# Allegro board DRV8313_V10_220621.brd
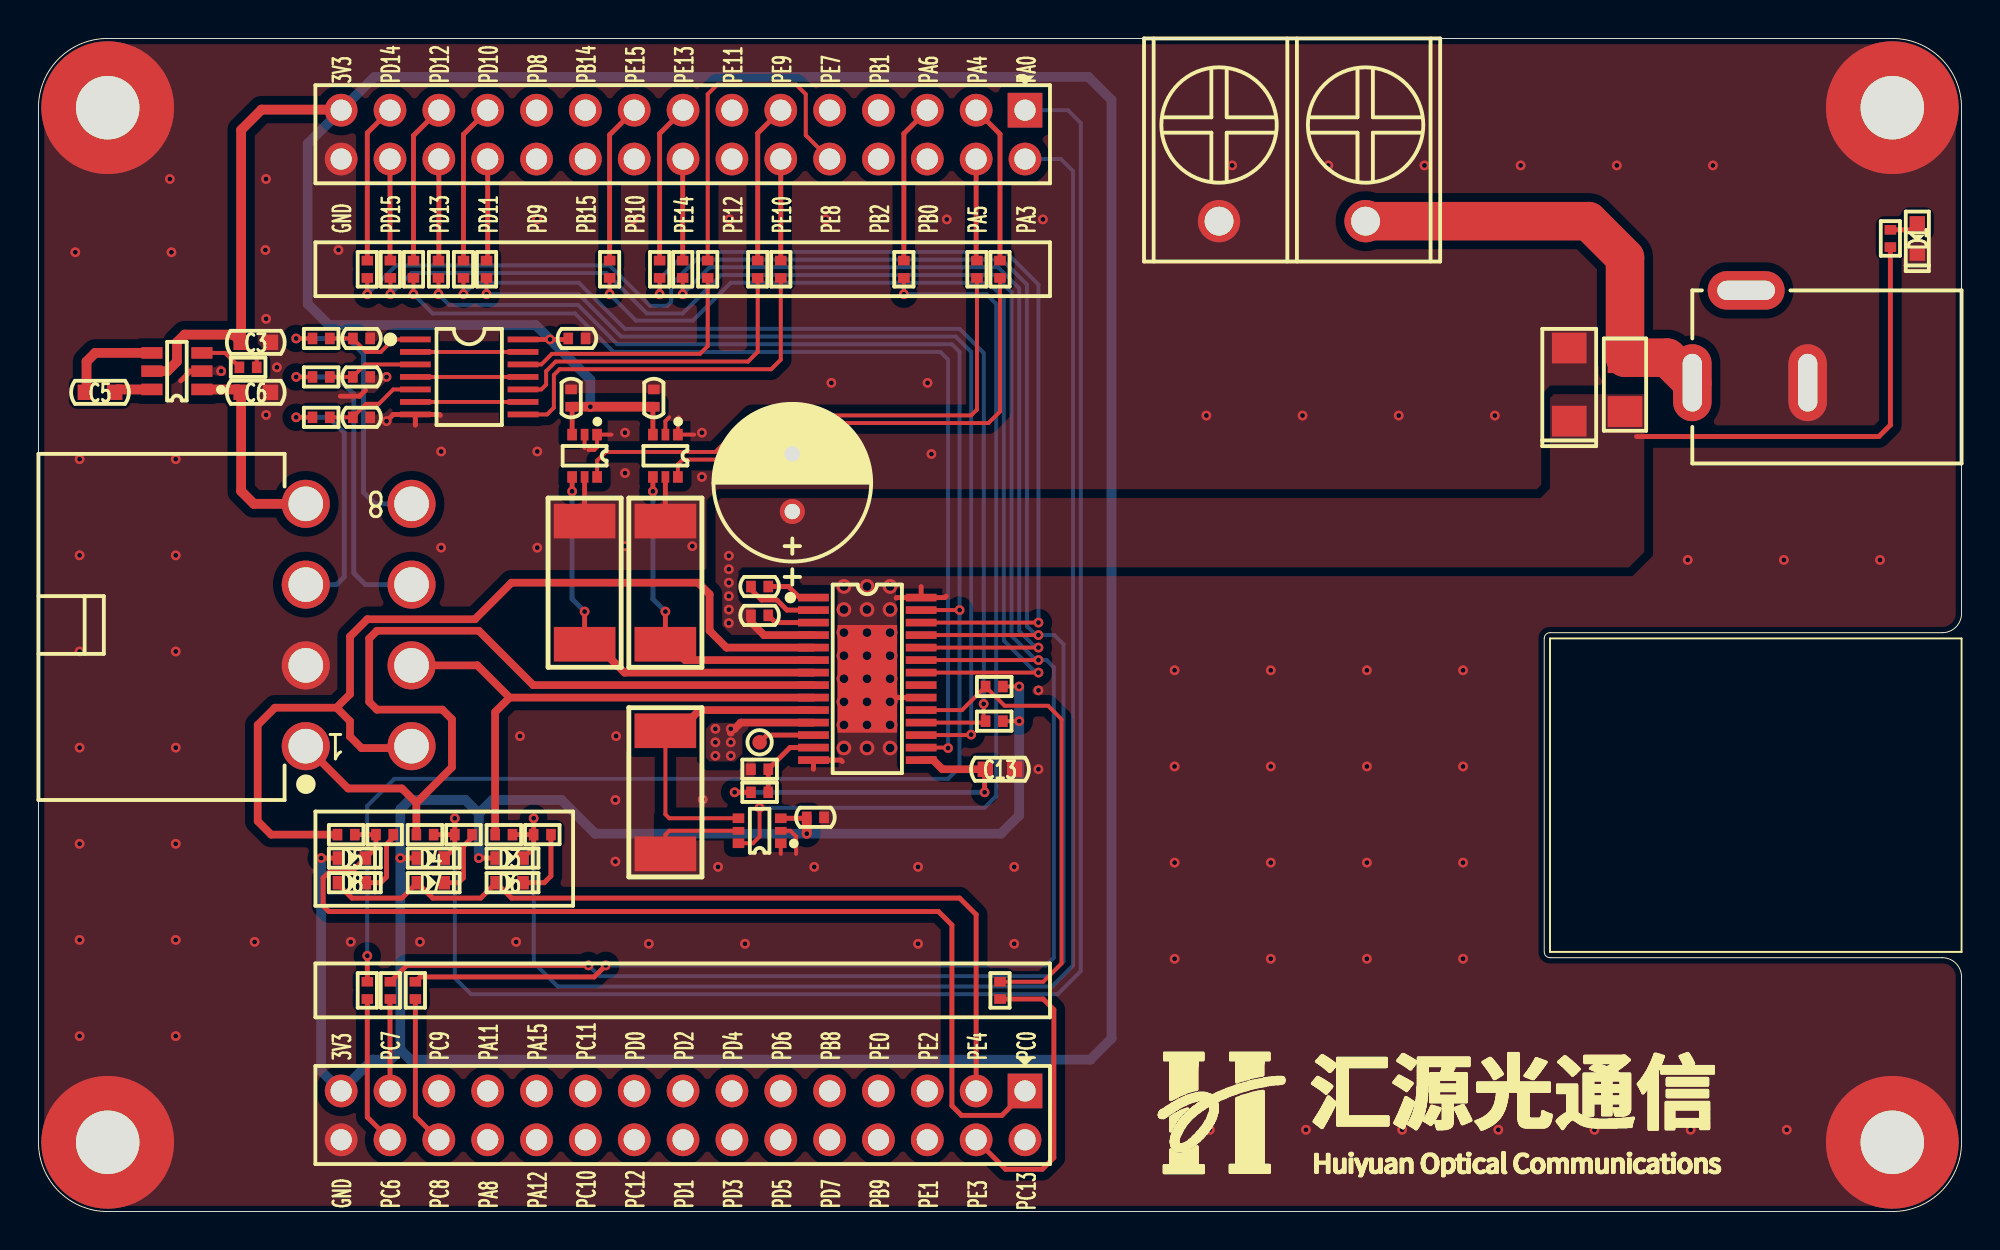
[diagram p0: board, top side]
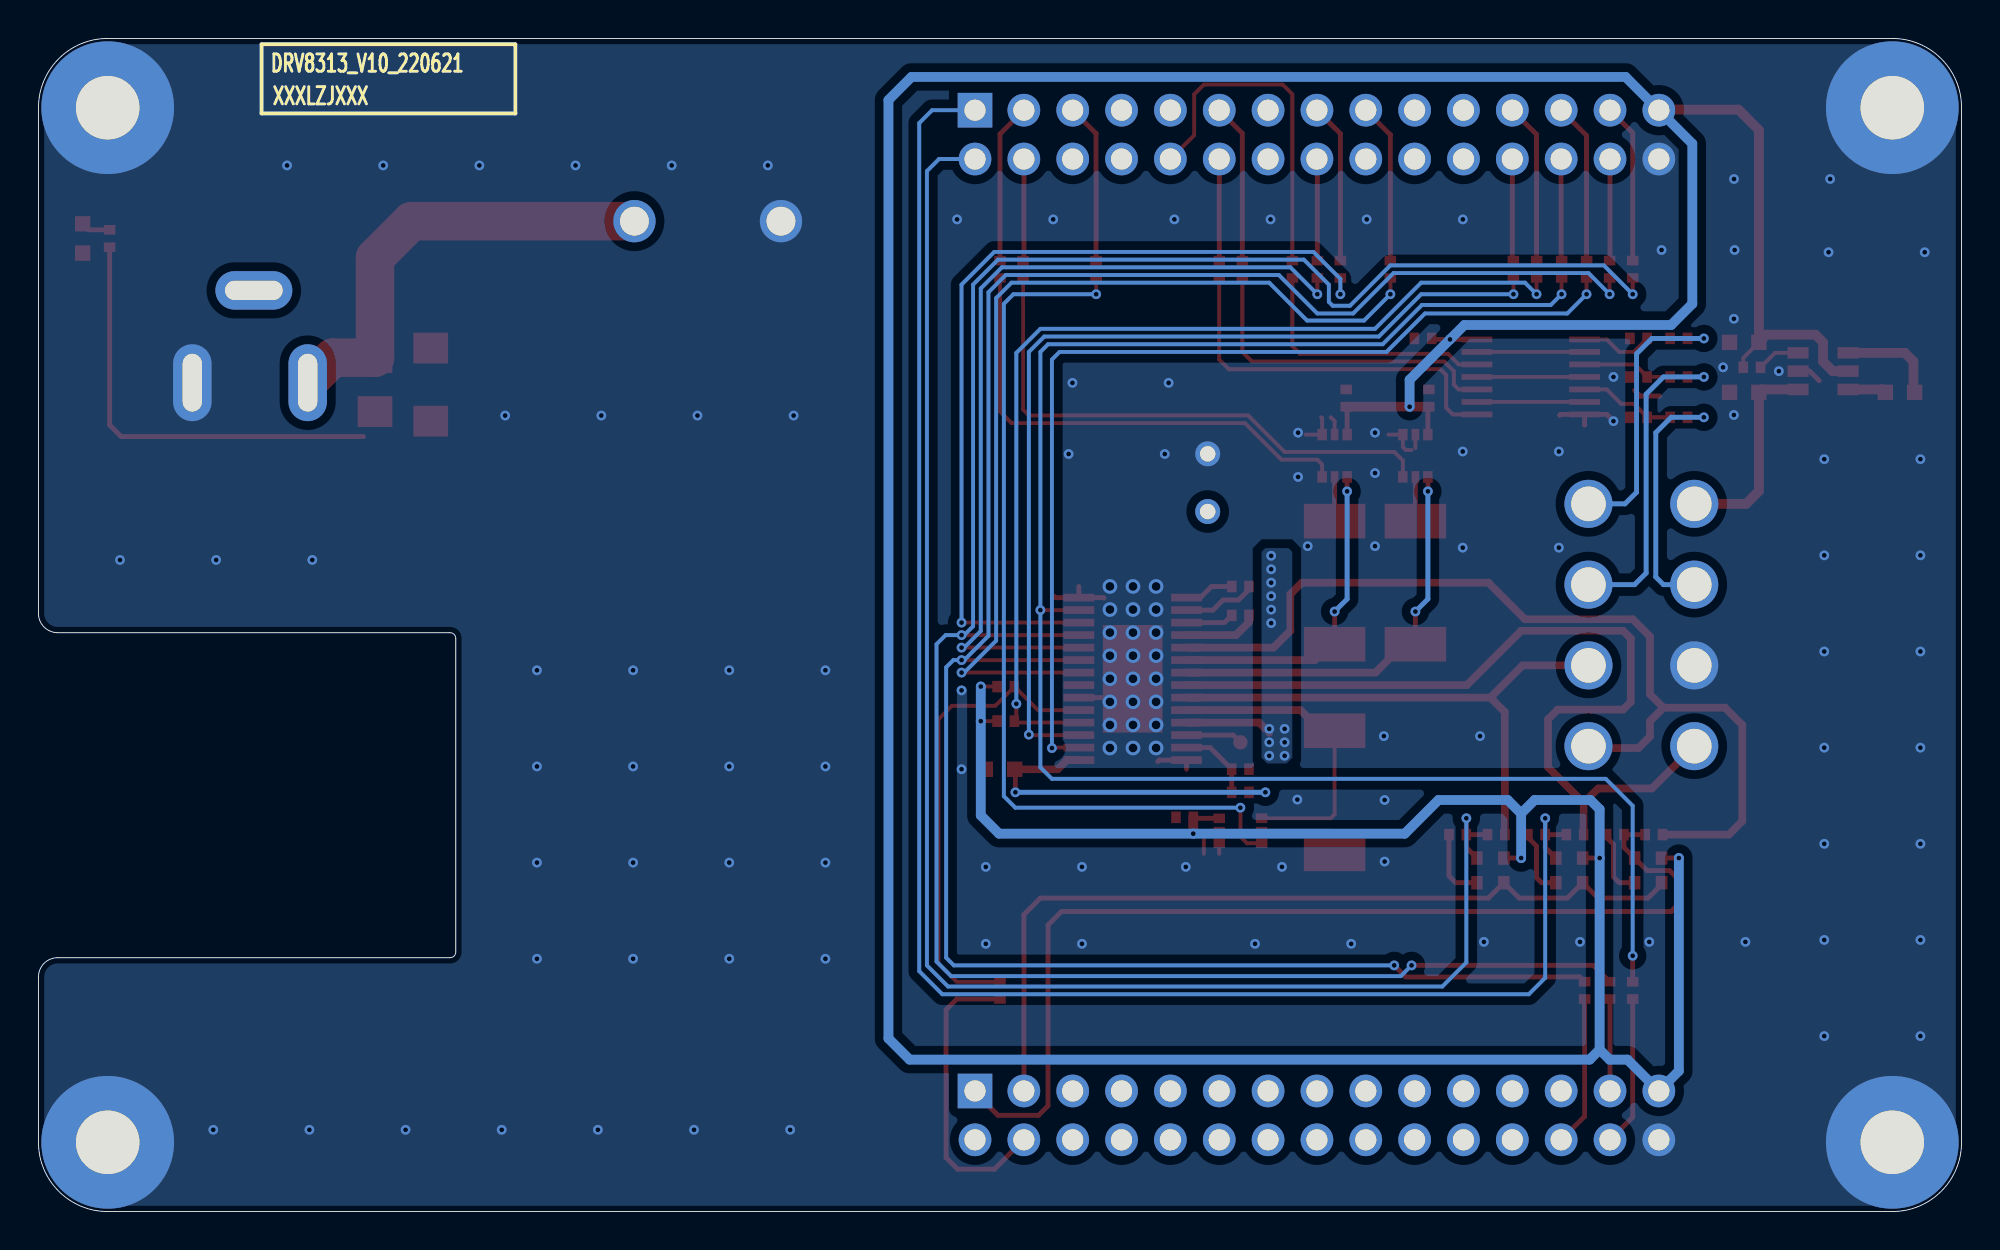
[diagram p1: board, bottom side, seen from below]

Outline 100 x 61 mm; copper layers: TOP, BOTTOM. Coordinates in mm from the lower left corner of the outline.
Outline path: 0,57.4 arc(1.05,59.95) 3.6,61 96.4,61 arc(98.95,59.95) 100,57.4 100,31.1 arc(99.71,30.39) 99,30.1 78.6,30.1 arc(78.39,30.01) 78.3,29.8 78.3,13.5 arc(78.39,13.29) 78.6,13.2 99,13.2 arc(99.71,12.91) 100,12.2 100,3.6 arc(98.95,1.05) 96.4,0 3.6,0 arc(1.05,1.05) 0,3.6 0,57.4

## Design rules (mm)
constraint set DEFAULT: min track width 0.203, pair gap 0.203

## Placement (name value [footprint] x y rotation side)
C1  100nF_50V  [C0402]  16.8 45.4 0 top
C2  100nF_50V  [C0402]  28 45.4 0 top
C3  10uF_10V  [C0603]  11.3 45.2 0 top
C4  100nF_50V  [C0402]  16.8 43.4 0 top
C5  10uF_10V  [C0603]  3.2 42.6 180 top
C6  10uF_10V  [C0603]  11.3 42.6 0 top
C7  100nF_50V  [C0402]  27.7 42.3 90 top
C8  100nF_50V  [C0402]  32 42.3 90 top
C9  100nF_50V  [C0402]  16.8 41.3 0 top
C10  100uF_50V  [CAP-3R0-8X12]  39.2 37.9 90 top
C11  10nF_50V  [C0402]  37.5 32.5 0 top
C12  100nF_50V  [C0402]  37.5 31 0 top
C13  10uF_10V  [C0603]  50 23 0 top
C14  100nF_50V  [C0402]  40.4 20.5 0 top
D1  GREEN-0603  [LED0603]  97.7 50.6 270 top
D2  SS56F  [SMAF]  79.6 43 270 top
D3  LRB521S-40T1G/NI  [SOD523]  24.5 18.38 180 top
D4  LRB521S-40T1G/NI  [SOD523]  20.4 18.38 180 top
D5  LRB521S-40T1G/NI  [SOD523]  16.3 18.38 180 top
D6  LRB521S-40T1G/NI  [SOD523]  24.5 17.1 180 top
D7  LRB521S-40T1G/NI  [SOD523]  20.4 17.1 180 top
D8  LRB521S-40T1G/NI  [SOD523]  16.3 17.1 180 top
DC1  -  [DC005]  92 43.1 180 top
F1  0469005.WR  [FUSE1206]  82.5 43 270 top
J1  -  [CN2X15-2P54-Z]  51.3 57.27 180 top
J2  KF7.62-2P  [KF7R62-2P]  65.2 51.5 0 top
J3  -  [HX42003-8WAF]  13.9 30.5 180 top
J4  -  [CN2X15-2P54-Z]  51.3 6.27 180 top
MH1  HOLE_M3/NI  [HOLE6R90X3R40]  3.6 57.4 0 top
MH2  HOLE_M3/NI  [HOLE6R90X3R40]  96.4 57.4 0 top
MH3  HOLE_M3/NI  [HOLE6R90X3R40]  3.6 3.6 0 top
MH4  HOLE_M3/NI  [HOLE6R90X3R40]  96.4 3.6 0 top
NOREF  -  []  0 0 90 top
NOREF#2  -  []  0 0 0 top
NOREF#3  -  []  0 0 0 top
NOREF#4  -  []  0 0 0 top
NOREF#5  -  []  0 0 90 top
NOREF#6  -  []  0 0 90 top
R1  47K  [R0402]  96.3 50.6 90 top
R2  0R  [R0402]  17.1 49 90 top
R3  0R  [R0402]  18.3 49 90 top
R4  0R  [R0402]  19.5 49 90 top
R5  0R  [R0402]  20.8 49 90 top
R6  0R  [R0402]  22.1 49 90 top
R7  0R  [R0402]  23.3 49 90 top
R8  0R  [R0402]  29.7 49 90 top
R9  0R  [R0402]  32.3 49 90 top
R10  0R  [R0402]  33.5 49 90 top
R11  0R  [R0402]  37.4 49 90 top
R12  0R  [R0402]  38.6 49 90 top
R13  0R  [R0402]  34.8 49 90 top
R14  0R  [R0402]  45 49 90 top
R15  0R  [R0402]  50 49 90 top
R16  0R  [R0402]  48.8 49 90 top
R17  1K  [R0402]  14.7 45.4 0 top
R18  10K  [R0402]  10.9 43.9 0 top
R19  1K  [R0402]  14.7 43.4 0 top
R20  1K  [R0402]  14.7 41.3 0 top
R21  5mR  [R2512]  28.4 32.7 270 top
R22  5mR  [R2512]  32.6 32.7 270 top
R23  10K  [R0402]  49.7 27.3 0 top
R24  10K  [R0402]  49.7 25.5 0 top
R25  10K/NI  [R0402]  37.5 23 0 top
R26  10K/NI  [R0402]  37.5 21.8 180 top
R27  5mR  [R2512]  32.6 21.8 90 top
R28  10K/NI  [R0402]  24.2 19.6 0 top
R29  2.2K/NI  [R0402]  26.2 19.6 0 top
R30  10K/NI  [R0402]  20.1 19.6 0 top
R31  2.2K/NI  [R0402]  22.1 19.6 0 top
R32  10K/NI  [R0402]  16 19.6 0 top
R33  2.2K/NI  [R0402]  18 19.6 0 top
R34  0R/NI  [R0402]  17.1 11.5 270 top
R35  0R/NI  [R0402]  18.3 11.5 270 top
R36  0R/NI  [R0402]  19.6 11.5 270 top
R37  0R  [R0402]  50 11.5 270 top
TP1  TP/NI  [TP-0R75]  37.5 24.4 90 top
U1  ME2135A50M6G  [SOT23-6]  7.2 43.7 90 top
U2  SN74LVC14APW  [TSSOP14]  22.4 43.4 270 top
U3  INA199A2DCKR  [SOT363]  28.4 39.3 180 top
U4  INA199A2DCKR  [SOT363]  32.6 39.3 180 top
U5  DRV8313PWP  [HTSSOP28-9R8X4R5X0R65-5R6X3R1]  43.1 27.7 270 top
U6  INA199A2DCKR  [SOT363]  37.5 19.8 90 top

## Library data of the parts
C1 C2 C4 C9 = CAP NP_2
C3 C5-C8 C11-C14 = CAP NP
C10 = CAPT_100UF_3528_6r3V_10%_LXXXX
D1 = LED_4
D2-D8 = DIODE13_9
DC1 = DC005
F1 = FUSE
J1 J4 = CONN RCPT 15x2
J2 = CONN RCPT 2
J3 = HX30002-10A_1
MH1-MH4 = Hold_1
R1-R37 = R_Generic
TP1 = TP
U1 = ME2135A50M6G
U2 = SN74LVC14APW
U3 U4 U6 = INA199A2DCKR
U5 = DRV8313PWP

## Footprints (pads in the part's own frame, mm; a bottom-side part is the same pattern mirrored in y, then rotated)
C0402
  rect 0.5x0.6 smd: 1(-0.45,0) 2(0.45,0)
C0603
  rect 0.8x0.8 smd: 1(-0.762,0) 2(0.762,0)
CAP-3R0-8X12
  round 1.3 hole 0.8: 1(-1.5,0) 2(1.5,0)
CN2X15-2P54-Z
  rect 1.8x1.8 hole 1.1: 1(0,0)
  round 1.7 hole 1.1: 2(0,2.54) 3(2.54,0) 4(2.54,2.54) 5(5.08,0) 6(5.08,2.54) 7(7.62,0) 8(7.62,2.54) 9(10.16,0) 10(10.16,2.54) 11(12.7,0) 12(12.7,2.54) 13(15.24,0) 14(15.24,2.54) 15(17.78,0) 16(17.78,2.54) 17(20.32,0) 18(20.32,2.54) 19(22.86,0) 20(22.86,2.54) 21(25.4,0) 22(25.4,2.54) 23(27.94,0) 24(27.94,2.54) 25(30.48,0) 26(30.48,2.54) 27(33.02,0) 28(33.02,2.54) 29(35.56,0) 30(35.56,2.54)
DC005
  oval 2x4 hole 1x3: 1(6,0) 2(0,0)
  oval 4x2 hole 3x1: 3(3.2,-4.8)
FUSE1206
  rect 1.6x1.8 smd: 1(-1.4,0) 2(1.4,0)
HOLE6R90X3R40
  round 6.9 hole 3.3: 1(0,0)
HTSSOP28-9R8X4R5X0R65-5R6X3R1
  rect 0.4x1.6 smd: 1(-4.225,-2.8) 2(-3.575,-2.8) 3(-2.925,-2.8) 4(-2.275,-2.8) 5(-1.625,-2.8) 6(-0.975,-2.8) 7(-0.325,-2.8) 8(0.325,-2.8) 9(0.975,-2.8) 10(1.625,-2.8) 11(2.275,-2.8) 12(2.925,-2.8) 13(3.575,-2.8) 14(4.225,-2.8) 15(4.225,2.8) 16(3.575,2.8) 17(2.925,2.8) 18(2.275,2.8) 19(1.625,2.8) 20(0.975,2.8) 21(0.325,2.8) 22(-0.325,2.8) 23(-0.975,2.8) 24(-1.625,2.8) 25(-2.275,2.8) 26(-2.925,2.8) 27(-3.575,2.8) 28(-4.225,2.8)
  rect 5.6x3.1 smd: 29(0,0)
HX42003-8WAF
  round 2.5 hole 1.8: 1(0,6.3) 2(0,2.1) 3(0,-2.1) 4(0,-6.3) 5(-5.5,6.3) 6(-5.5,2.1) 7(-5.5,-2.1) 8(-5.5,-6.3)
KF7R62-2P
  round 2.2 hole 1.5: 1(-3.81,0) 2(3.81,0)
LED0603
  rect 0.8x0.8 smd: 1(-0.762,0) 2(0.762,0)
R0402
  rect 0.5x0.6 smd: 1(-0.45,0) 2(0.45,0)
R2512
  rect 1.8x3.2 smd: 1(-3.2,0) 2(3.2,0)
SMAF
  rect 1.6x1.8 smd: 1(-1.9,0) 2(1.9,0)
SOD523
  rect 0.6x0.7 smd: 1(-0.7,0) 2(0.7,0)
SOT23-6
  rect 0.6x1.1 smd: 1(-0.95,-1.3) 2(0,-1.3) 3(0.95,-1.3) 4(0.95,1.3) 5(0,1.3) 6(-0.95,1.3)
SOT363
  rect 0.5x0.6 smd: 1(-0.65,-1.1) 3(0.65,-1.1) 4(0.65,1.1) 6(-0.65,1.1)
  rect 0.4x0.6 smd: 2(0,-1.1) 5(0,1.1)
TP-0R75
  round 0.75 smd: 1(0,0)
TSSOP14
  rect 0.3x1.6 smd: 1(-1.95,-2.8) 2(-1.3,-2.8) 3(-0.65,-2.8) 4(0,-2.8) 5(0.65,-2.8) 6(1.3,-2.8) 7(1.95,-2.8) 8(1.95,2.8) 9(1.3,2.8) 10(0.65,2.8) 11(0,2.8) 12(-0.65,2.8) 13(-1.3,2.8) 14(-1.95,2.8)

## Nets
GND: C1.2 C2.2 C3.2 C4.2 C6.2 C7.2 C8.2 C9.2 C10.2 C13.2 C14.2 D1.2(CATHODE) D2.1 DC1.2 J1.30 J2.1 J3.2 J4.30 MH1.1 MH2.1 MH3.1 MH4.1 R21.1 R22.1 R25.1 R27.1 U1.2 U2.7 U3.1 U3.2 U3.5 U4.1 U4.2 U4.5 U5.14 U5.20 U5.28 U5.29 U6.1 U6.2 U6.5
PGND1: R22.2 U4.4 U5.6
PGND2: R21.2 U3.4 U5.7
PGND3: R27.2 U5.10 U6.4
VCC_3.3V: C2.1 C3.1 C7.1 C8.1 C14.1 D3.2(ANODE_2) D4.2(ANODE_2) D5.2(ANODE_2) J1.29 J4.29 R18.2 R23.2 R24.2 U1.5 U2.14(VCC) U3.3(V+) U4.3(V+) U6.3(V+)
VCC_3.3V_MOTOR: C13.1 R26.2 U5.15
VCC_5V: C6.1 J3.4 U1.1(VO)
VCC_24V: C10.1 C12.1 D2.2(ANODE_2) F1.2 R1.1 U5.4 U5.11(VM_2)
VCC_24V_IN: DC1.1 F1.1 J2.2
COMPN: R25.2 R26.1 U5.13
COMPP: TP1.1 U5.12
CURR_U: R15.1 U4.6
CURR_V: R16.1 U3.6
CURR_W: R14.1 U6.6
EN1: R9.1 U5.26
EN2: R10.1 U5.24
EN3: R8.1 U5.22
H1: J3.8 R17.1
H2: J3.7 R19.1
H3: J3.3 R20.1
HALL_H1: R13.1 U2.12
HALL_H2: R11.1 U2.10
HALL_H3: R12.1 U2.8
IN1: R5.1 R34.1 U5.27
IN2: R2.1 R35.1 U5.25
IN3: R3.1 R36.1 U5.23
MOTOR_U: J3.5 R32.1 U5.5
MOTOR_V: J3.1 R30.1 U5.8
MOTOR_W: J3.6 R28.1 U5.9
NCOMPO: R23.1 R37.1 U5.19
NFAULT: R6.1 R24.1 U5.18
NRESET: R4.1 U5.16
NSLEEP: R7.1 U5.17
PA0: D4.1 J1.1 R30.2 R31.1
PA3: D3.1 J1.2 R28.2 R29.1
PA4: J1.3 R15.2
PA5: J1.4 R16.2
PA6: J1.5 R14.2
PA8: J4.24
PA11: J4.23
PA12: J4.22
PA15: J4.21
PB0: J1.6
PB1: J1.7
PB2: J1.8
PB8: J4.9
PB9: J4.8
PB10: J1.18
PB14: J1.19
PB15: J1.20
PC0: D5.1 J4.1 R32.2 R33.1
PC6: J4.28 R34.2
PC7: J4.27 R35.2
PC8: J4.26 R36.2
PC9: J4.25
PC10: J4.20
PC11: J4.19
PC12: J4.18
PC13: J4.2
PD0: J4.17(9)
PD1: J4.16
PD2: J4.15
PD3: J4.14
PD4: J4.13
PD5: J4.12
PD6: J4.11
PD7: J4.10
PD8: J1.21
PD9: J1.22
PD10: J1.23 R6.2
PD11: J1.24 R7.2
PD12: J1.25 R4.2
PD13: J1.26 R5.2
PD14: J1.27 R2.2
PD15: J1.28 R3.2
PE0: J4.7
PE1: J4.6
PE2/SPI0_CS: J4.5
PE3: J4.4 R37.2
PE4: D6.2(ANODE_2) D7.2(ANODE_2) D8.2(ANODE_2) J4.3
PE7: J1.9
PE8: J1.10 R13.2
PE9: J1.11 R11.2
PE10: J1.12 R12.2
PE11: J1.13
PE12: J1.14
PE13: J1.15 R9.2
PE14: J1.16 R10.2
PE15: J1.17(9) R8.2
N17281076: D8.1 R33.2
N17281273: D7.1 R31.2
N17281452: D6.1 R29.2
N17289816: C11.2 U5.1
N17289823: C11.1 U5.2
N17289896: C12.2 U5.3
N17294145: U2.6 U2.9
N17294151: U2.4 U2.11
N17294165: U2.2 U2.13
N17294205: C1.1 R17.2 U2.1
N17294227: C4.1 R19.2 U2.3
N17294251: C9.1 R20.2 U2.5
N17299802: C5.1 U1.6
N17299805: C5.2 U1.4
N17300514: R18.1 U1.3
N17303878: D1.1 R1.2

Pads without a net: DC1 3; U5 21

## Via types
v1: diameter 0.508, hole 0.254, TOP to BOTTOM, 155 vias
v2: diameter 0.762, hole 0.457, TOP to BOTTOM, 24 vias

## Routing (per net, layer and track width the routed paths; a pad name or vN(x,y) marks a point on that pad's centre or on a via; arc(x,y) is an arc through that point)
GND: length 31.9
  TOP w0.203: U3.2 28.4,39.7 ; 33.3,41.3 33.25,41.25 U4.1 34.1,40.4 ; 39.4,18.6 39.4,19.5 39.1,19.8 U6.2 ; 29.8,40.4 U3.1 29.05,39.75 28.9,39.6 28.6,39.6 ; R27.1 32.6,19.6 32.8,19.8 U6.5 ; U4.2 32.6,41.1 32.8,41.3 ; U6.1 38.6,18.6
  TOP w0.254: 19.6,40.9 19.6,40.9 U2.7 ; U4.5 R22.1 ; U5.28 44.62,31.93 44.6,31.9 ; U5.28 47.12,31.93 47.2,32 ; U5.28 45.9,32.5 ; U2.7 20.85,41.45 20.9,41.4 ; U2.7 18.45,41.45 v1(18.1,41.1) ; 41.8,23.4 41.73,23.48 U5.14 40.3,23 ; 17,42.7 16.7,42.4 15.7,42.4 ; 7.4,43.2 7.9,43.7 U1.2 ; U5.20 44.08,26.73 U5.29 ; U3.5 R21.1
  vias: v1(1.92,49.88) v1(2.14,39.12) v1(2.14,34.12) v1(2.14,29.12) v1(2.14,24.12) v1(2.14,19.12) v1(2.14,14.12) v1(2.14,9.12) v1(6.83,53.69) v1(6.92,49.88) v1(7.14,39.12) v1(7.14,34.12) v1(7.14,29.12) v1(7.14,24.12) v1(7.14,19.12) v1(7.14,14.12) v1(7.14,9.12) v1(9.5,43.7) v1(11.24,14.02) v1(11.83,53.69) v1(11.8,50) v1(11.84,46.42) v1(11.84,41.42) v1(12.4,43.9) v1(15.6,50) v1(16.24,14.02) v1(18.1,43.4) v1(19.84,14.02) v1(20.94,39.52) v1(20.94,34.52) v1(24.84,14.02) v1(25.04,24.72) v1(25.93,51.59) v1(25.94,39.52) v1(25.94,34.52) v1(30.04,24.72) v1(30,21.4) v1(30,18.2) v1(30.5,40.5) v1(30.5,38.4) v1(30.5,34.6) v1(30.93,51.59) v1(31.74,13.92) v1(34,34.6) v1(34.5,40.5) v1(34.5,38.2) v1(34.54,21.42) v1(35.34,17.92) v1(35.93,51.59) v1(36.74,13.92) v1(40.34,17.92) v1(40.93,51.59) v1(41.23,43.09) v1(41.43,39.39) v1(45.74,17.92) v1(45.74,13.92) v1(46.23,43.09) v1(46.43,39.39) v1(47.23,51.59) v1(50.74,17.92) v1(50.74,13.92) v1(52,27.1) v1(52,23) v1(52.23,51.59) v1(59.08,28.14) v1(59.08,23.14) v1(59.08,18.14) v1(59.08,13.14) v1(60.73,41.39) v1(60.91,4.25) v1(62.07,54.4) v1(64.08,28.14) v1(64.08,23.14) v1(64.08,18.14) v1(64.08,13.14) v1(65.73,41.39) v1(65.91,4.25) v1(67.07,54.4) v1(69.08,28.14) v1(69.08,23.14) v1(69.08,18.14) v1(69.08,13.14) v1(70.73,41.39) v1(70.91,4.25) v1(72.07,54.4) v1(74.08,28.14) v1(74.08,23.14) v1(74.08,18.14) v1(74.08,13.14) v1(75.73,41.39) v1(75.91,4.25) v1(77.07,54.4) v1(80.91,4.25) v1(82.07,54.4) v1(85.76,33.88) v1(85.91,4.25) v1(87.07,54.4) v1(90.76,33.88) v1(90.91,4.25) v1(95.76,33.88) v2(41.88,32.5) v2(41.88,31.3) v2(41.88,30.1) v2(41.88,28.9) v2(41.88,27.7) v2(41.88,26.5) v2(41.88,25.3) v2(41.88,24.1) v2(43.08,32.5) v2(43.08,31.3) v2(43.08,30.1) v2(43.08,28.9) v2(43.08,27.7) v2(43.08,26.5) v2(43.08,25.3) v2(43.08,24.1) v2(44.28,32.5) v2(44.28,31.3) v2(44.28,30.1) v2(44.28,28.9) v2(44.28,27.7) v2(44.28,26.5) v2(44.28,25.3) v2(44.28,24.1)
PGND1: length 17
  TOP w0.254: R22.2 v1(32.6,31.2) ; U4.4 v1(31.95,37.45)
  TOP w0.4: U5.6 33.62,28.68 32.8,29.5 R22.2
  BOTTOM w0.254: v1(31.95,37.45) 31.95,31.85 v1(32.6,31.2)
PGND2: length 21.5
  TOP w0.254: U3.4 v1(27.75,37.45) ; R21.2 v1(28.4,31.2)
  TOP w0.4: R21.2 28.45,29.55 28.95,29.55 30.48,28.02 U5.7
  BOTTOM w0.254: v1(28.4,31.2) 27.75,31.85 v1(27.75,37.45)
PGND3: length 16.4
  TOP w0.203: U6.4 32.8,20.45 32.6,20.65 R27.2
  TOP w0.4: R27.2 33.3,25 34.38,26.07 U5.10
VCC_3.3V: length 269.1
  TOP w0.203: C3.1 11.35,44.39 R18.2 ; R24.2 v1(51,25.5) ; R23.2 v1(51,27.3)
  TOP w0.254: C7.1 27.75,41.8 U3.3 ; D5.2 v1(14.7,18.38) ; U6.3 39.9,20.45 C14.1 ; D3.2 v1(22.9,18.38) ; C2.1 27.5,45.35 v1(26.6,45.35) U2.14 ; D4.2 v1(18.82,18.38) ; U4.3 31.95,41.8 C8.1
  TOP w0.508: C14.1 v1(39.95,19.65) ; C7.1 v1(28.7,41.85) C8.1 ; J1.29 15.71,57.3 11.6,57.3 10.54,56.24 C3.1 10.14,45.6 7.6,45.6 7.2,45.2 7.2,44.2 6.7,43.7 U1.5
  BOTTOM w0.508: v1(14.7,18.38) 14.7,7.31 J4.29 17.37,7.9 18.3,7.9 18.82,8.42 ; v1(22.9,18.38) 22.9,20.7 ; 22.9,20.7 23.6,21.4 27.2,21.4 28.95,19.65 v1(39.95,19.65) 50.05,19.65 51,20.6 v1(51,25.5) v1(51,27.3) ; 22.9,20.7 22.2,21.4 19.3,21.4 18.82,20.92 v1(18.82,18.38) 18.82,8.42 ; 18.82,8.42 19.34,7.9 54.7,7.9 55.8,9 55.8,57.8 54.6,59 17.47,59 J1.29 14,55.53 14,47.2 15.1,46.1 25.85,46.1 v1(26.6,45.35) 28.7,43.25 v1(28.7,41.85)
VCC_3.3V_MOTOR: length 18.6
  TOP w0.254: v1(49.2,21.8) 49.2,22.96 C13.1 ; R26.2 v1(36.2,21.8)
  TOP w0.4: C13.1 47,23 46.52,23.48 U5.15
  BOTTOM w0.254: v1(36.2,21.8) v1(49.2,21.8)
VCC_5V: length 10.9
  TOP w0.508: J3.4 11.2,36.8 10.54,37.46 C6.1 10.39,42.75 U1.1
VCC_24V: length 31.2
  TOP w0.254: R1.1 96.3,40.9 95.7,40.3 83.1,40.3
  TOP w0.4: 40.3,29.98 37.73,29.98 37.05,30.65 C12.1 ; U5.11 36.52,25.43 36.2,25.1 v1(36,25.1) 36,24.9
  vias: v1(35.2,25.1) v1(35.2,24.4) v1(35.2,23.7) v1(35.9,34.1) v1(35.9,33.4) v1(35.9,32.7) v1(35.9,32) v1(35.9,31.3) v1(35.9,30.6) v1(36,24.4) v1(36,23.7)
VCC_24V_IN: length 23.5
  TOP w2: DC1.1 84.7,44.4 F1.1 82.5,49.6 80.6,51.5 J2.2
COMPN: length 4
  TOP w0.254: U5.13 39.08,24.12 R25.2 R26.1
COMPP: length 3
  TOP w0.254: TP1.1 37.88,24.77 U5.12
CURR_U: length 25.5
  TOP w0.203: R15.1 50,41.6 49.4,41 37.27,41 35.37,39.1 33.5,39.1 33.25,38.85 U4.6
CURR_V: length 28.5
  TOP w0.203: U3.6 29.05,39.05 29.5,39.5 35.2,39.5 37.1,41.4 48.5,41.4 48.8,41.7 R16.1
CURR_W: length 46.7
  TOP w0.203: R14.1 v1(45,47.7) ; v1(37.5,21) 37.5,19.5 37.15,19.15 U6.6
  BOTTOM w0.203: v1(37.5,21) 49.2,21 49.8,21.6 49.8,47.2 49.3,47.7 v1(45,47.7)
EN1: length 46.3
  TOP w0.203: R9.1 v1(32.3,47.7) ; U5.26 v1(52,30.62)
  BOTTOM w0.203: v1(52,30.62) 52,48.2 50.3,49.9 33.7,49.9 32.3,48.5 v1(32.3,47.7)
EN2: length 44.7
  TOP w0.203: U5.24 v1(52,29.32) ; R10.1 v1(33.5,47.7)
  BOTTOM w0.203: v1(33.5,47.7) 34.9,49.1 49.9,49.1 51,48 51,30.18 51.86,29.32 v1(52,29.32)
EN3: length 49.5
  TOP w0.203: U5.22 v1(52,28.02) ; R8.1 v1(29.7,47.7)
  BOTTOM w0.203: v1(29.7,47.7) 31.07,46.33 34.03,46.33 36,48.3 49.4,48.3 50.2,47.5 50.2,29.68 51.86,28.02 v1(52,28.02)
H1: length 14.6
  TOP w0.203: R17.1 v1(13.4,45.4)
  BOTTOM w0.254: v1(13.4,45.4) 16.1,45.4 16.9,44.6 16.9,37.4 17.5,36.8 J3.8
H2: length 16.8
  TOP w0.203: R19.1 v1(13.4,43.4)
  BOTTOM w0.254: v1(13.4,43.4) 15.5,43.4 16.4,42.5 16.4,33.2 17,32.6 J3.7
H3: length 13.3
  TOP w0.203: R20.1 v1(13.4,41.3)
  BOTTOM w0.254: v1(13.4,41.3) 15.1,41.3 15.9,40.5 15.9,33 15.5,32.6 J3.3
HALL_H1: length 13.5
  TOP w0.203: R13.1 34.8,45 34.4,44.6 26.7,44.6 26.15,44.05 U2.12
HALL_H2: length 17.3
  TOP w0.203: U2.10 26.15,42.75 26.4,43 26.4,43.7 26.9,44.2 36.9,44.2 37.4,44.7 R11.1
HALL_H3: length 19.8
  TOP w0.203: U2.8 26.45,41.45 26.8,41.8 26.8,43.5 27.1,43.8 38.1,43.8 38.6,44.3 R12.1
IN1: length 93.6
  TOP w0.203: R5.1 v1(20.8,47.7) ; v1(47.9,31.27) U5.27
  TOP w0.254: R34.1 v1(17.1,13.3)
  BOTTOM w0.203: v1(20.8,47.7) 21.36,47.14 28.06,47.14 30.1,45.1 47.5,45.1 47.9,44.7 v1(47.9,31.27) 47.9,23.1 47.3,22.5 18.5,22.5 17.1,21.1 v1(17.1,13.3)
IN2: length 117.2
  TOP w0.203: R2.1 v1(17.1,47.7) ; 45.9,29.98 v1(52,29.98)
  TOP w0.254: R35.1 19.15,12.8 v1(28.6,12.8)
  BOTTOM w0.203: v1(17.1,47.7) 18.6,49.2 29.7,49.2 31.8,47.1 32.7,47.1 32.9,47.3 32.9,48.2 34.2,49.5 50.1,49.5 51.4,48.2 51.4,30.43 51.86,29.98 v1(52,29.98) 52.83,29.98 53.3,29.5 53.3,13 52.54,12.24 29.16,12.24 v1(28.6,12.8)
IN3: length 111.3
  TOP w0.203: U5.23 v1(52,28.68) ; R3.1 v1(18.3,47.7)
  TOP w0.254: v1(29.5,12.8) 28.9,12.2 19.85,12.2 R36.1
  BOTTOM w0.203: v1(18.3,47.7) 19.4,48.8 29.53,48.8 31.63,46.7 33.5,46.7 35.5,48.7 49.7,48.7 50.6,47.8 50.6,29.93 51.86,28.68 v1(52,28.68) 52.42,28.68 52.8,28.3 52.8,13.2 52.4,12.8 v1(29.5,12.8)
MOTOR_U: length 51
  TOP w0.4: J3.5 19.3,24.1 16.8,24.1 16.2,24.7 16.2,25.5 15.5,26.2 ; 15.5,26.2 16.2,26.9 16.2,29.9 17.1,30.8 22.7,30.8 24.6,32.7 34.3,32.7 34.9,32.1 34.9,30.2 35.77,29.32 U5.5 ; 15.5,26.2 12.3,26.2 11.4,25.3 11.4,20.3 12.1,19.6 R32.1
MOTOR_V: length 46.1
  TOP w0.4: 19.65,21.25 18.9,22 16.1,22 J3.1 ; 19.65,21.25 R30.1 ; 19.65,21.25 21.5,23.1 21.5,25.6 21,26.1 17.6,26.1 17.2,26.5 17.2,29.8 17.6,30.2 22.9,30.2 25.73,27.38 U5.8
MOTOR_W: length 29
  TOP w0.4: 24.5,26.73 U5.9 ; 24.5,26.73 23.75,25.98 R28.1 ; 24.5,26.73 22.82,28.4 J3.6
NCOMPO: length 24.8
  TOP w0.203: U5.19 48.02,26.07 R23.1 49.25,27.29 50.24,26.3 52.5,26.3 53.2,25.6 53.2,12.9 52.25,11.95 R37.1
NFAULT: length 52.2
  TOP w0.203: v1(49.15,26.4) 49.15,25.6 R24.1 49.17,25.43 U5.18 ; R6.1 v1(22.1,47.7)
  BOTTOM w0.203: v1(49.15,26.4) 49.15,44.65 47.9,45.9 30.5,45.9 28.1,48.3 22.7,48.3 v1(22.1,47.7)
NRESET: length 51.7
  TOP w0.203: U5.16 47.17,24.12 47.2,24.1 v1(47.3,24.1) ; R4.1 v1(19.5,47.7)
  BOTTOM w0.203: v1(47.3,24.1) 47.3,44.3 46.9,44.7 29.9,44.7 27.9,46.7 20.5,46.7 v1(19.5,47.7)
NSLEEP: length 49.8
  TOP w0.203: U5.17 48.48,24.77 v1(48.5,24.8) ; R7.1 v1(23.3,47.7)
  BOTTOM w0.203: v1(48.5,24.8) 48.5,44.7 47.7,45.5 30.3,45.5 28.1,47.7 v1(23.3,47.7)
PA0: length 92.4
  TOP w0.254: R31.1 21.65,18.93 D4.1 ; R31.1 v1(21.65,20.45) ; R31.1 R30.2
  BOTTOM w0.203: v1(21.65,20.45) 21.65,12.15 22.5,11.3 53,11.3 54.2,12.5 54.2,56.6 53.53,57.27 J1.1
PA3: length 84
  TOP w0.254: R29.1 v1(25.75,20.45) ; R29.1 R28.2 ; R29.1 25.75,18.93 D3.1
  BOTTOM w0.203: J1.2 53.17,54.73 53.8,54.1 53.8,12.8 52.7,11.7 27,11.7 25.75,12.95 v1(25.75,20.45)
PA4: length 8.3
  TOP w0.254: R15.2 50,56.03 J1.3
PA5: length 5.3
  TOP w0.254: R16.2 48.76,49.49 J1.4
PA6: length 8.3
  TOP w0.254: R14.2 45,56.05 J1.5
PC0: length 53.7
  TOP w0.254: J4.1 51.3,6.2 50.1,5 48,5 47.5,5.5 47.5,14.9 46.8,15.6 15.1,15.6 14.8,15.9 14.8,17.35 15.18,17.73 16.35,17.73 D5.1 17.55,18.93 R33.1 R32.2
PC6: length 7.8
  TOP w0.254: J4.28 17.1,4.91 R34.2
PC7: length 4.8
  TOP w0.254: J4.27 18.28,11.03 R35.2
PC8: length 7.8
  TOP w0.254: J4.26 19.6,4.95 R36.2
PD10: length 8.3
  TOP w0.254: R6.2 22.1,56.01 J1.23
PD11: length 5.3
  TOP w0.254: R7.2 23.36,49.51 J1.24
PD12: length 8.4
  TOP w0.254: J1.25 19.5,55.95 R4.2
PD13: length 5.3
  TOP w0.254: R5.2 20.82,49.47 J1.26
PD14: length 8.3
  TOP w0.254: R2.2 17.1,56.09 J1.27
PD15: length 5.3
  TOP w0.254: R3.2 18.28,49.47 J1.28
PE3: length 15.7
  TOP w0.254: R37.2 52.25,11.05 52.8,10.5 52.8,2.8 52.2,2.2 50.29,2.2 J4.4
PE4: length 44.4
  TOP w0.254: J4.3 48.76,15.44 47.9,16.3 24.6,16.3 D6.2 23,16.3 20.5,16.3 D7.2 18.9,16.3 16.3,16.3 15.6,17 D8.2
PE8: length 18
  TOP w0.203: R13.2 34.8,58.1 35.3,58.6 39.4,58.6 39.9,58.1 39.9,55.97 J1.10
PE9: length 8.3
  TOP w0.254: R11.2 37.4,56.07 J1.11
PE10: length 5.3
  TOP w0.254: R12.2 J1.12
PE13: length 8.3
  TOP w0.254: R9.2 32.3,56.05 J1.15
PE14: length 5.3
  TOP w0.254: J1.16 33.5,54.71 R10.2
PE15: length 8.4
  TOP w0.254: J1.17 29.7,55.99 R8.2
N17281076: length 3.6
  TOP w0.254: R33.2 18.45,19.45 18.1,19.1 18.1,17.4 17.8,17.1 D8.1
N17281273: length 3.5
  TOP w0.254: R31.2 22.55,19.45 22.1,19 22.1,17.35 21.85,17.1 D7.1
N17281452: length 3.7
  TOP w0.254: R29.2 26.65,17.45 26.3,17.1 D6.1
N17289816: length 2.6
  TOP w0.254: C11.2 39,32.5 39.58,31.93 U5.1
N17289823: length 3.8
  TOP w0.254: U5.2 38.92,31.27 38.4,31.8 37.6,31.8 37.05,32.35 C11.1
N17289896: length 2.5
  TOP w0.254: C12.2 38.33,30.62 U5.3
N17294145: length 5.6
  TOP w0.203: U2.6 U2.9
N17294151: length 5.6
  TOP w0.203: U2.4 U2.11
N17294165: length 5.6
  TOP w0.203: U2.2 U2.13
N17294205: length 5
  TOP w0.203: U2.1 18.45,45.35 17.8,44.7 17.04,44.7 16.35,45.39 C1.1 R17.2
N17294227: length 4.7
  TOP w0.203: U2.3 16.99,44.05 16.35,43.41 C4.1 R19.2
N17294251: length 5.1
  TOP w0.203: R20.2 C9.1 16.35,41.31 17.04,42 17.7,42 18.45,42.75 U2.5
N17299802: length 2
  TOP w0.508: C5.1 4.11,42.75 U1.6
N17299805: length 5.2
  TOP w0.508: U1.4 2.95,44.65 2.5,44.2 2.5,42.66 C5.2
N17300514: length 2.3
  TOP w0.203: R18.1 9.7,44.65 U1.3
N17303878: length 1.5
  TOP w0.254: R1.2 97.39,51.05 D1.1

## Copper pours and planes (outline as drawn; the poured copper is in the pictures)
GND on TOP: 0.3,57.4 1.27,59.73 3.6,60.7 96.4,60.7 98.73,59.73 99.7,57.4 99.7,31.1 99.49,30.61 99,30.4 78.6,30.4 78.18,30.22 78,29.8 78,13.5 78.18,13.08 78.6,12.9 99,12.9 99.49,12.69 99.7,12.2 99.7,3.6 98.73,1.27 96.4,0.3 3.6,0.3 1.27,1.27 0.3,3.6 ; 33 cut-outs
GND on BOTTOM: 0.3,57.4 1.27,59.73 3.6,60.7 96.4,60.7 98.73,59.73 99.7,57.4 99.7,31.1 99.49,30.61 99,30.4 78.6,30.4 78.18,30.22 78,29.8 78,13.5 78.18,13.08 78.6,12.9 99,12.9 99.49,12.69 99.7,12.2 99.7,3.6 98.73,1.27 96.4,0.3 3.6,0.3 1.27,1.27 0.3,3.6 ; 29 cut-outs
VCC_24V on TOP: 35.5,37.1 35.2,36.8 35.2,30.5 35.9,29.8 37.7,29.8 37.8,29.9 37.8,30.2 37.3,30.7 37.3,31.4 36.8,31.4 36.4,31.8 36.4,33.3 36.6,33.5 82.7,33.5 83.5,34.3 83.5,42.5 78.8,42.5 78.6,42.3 78.6,37.6 78.1,37.1
VCC_24V on TOP: 37,25.6 35.2,25.6 34.7,25.1 34.7,23.6 34.9,23.4 36.2,23.4 36.6,23.8 36.6,24.8 37.1,25.3 37.1,25.5
VCC_24V on BOTTOM: 36.2,34.5 35,34.5 34.8,34.3 34.8,23.6 35.1,23.3 36.1,23.3 36.4,23.6 36.4,34.3

## Text on the board
Ref Des/Silkscreen Bottom: XXXLZJXXX | DRV8313_V10_220621
Ref Des/Silkscreen Top: 3V3 | GND | PD14 | PD15 | PC7 | PC6 | PD12 | PD13 | PC9 | PC8 | PD10 | PD11 | PA11 | PA8 | PD8 | PD9 | PA15 | PA12 | PB14 | PB15 | PC11 | PC10 | PE15 | PB10 | PD0 | PC12 | PE13 | PE14 | PD2 | PD1 | PE11 | PE12 | PD4 | PD3 | PE9 | PE10 | PD6 | PD5 | PE7 | PE8 | PB8 | PD7 | PB1 | PB2 | PE0 | PB9 | PA6 | PB0 | PE2 | PE1 | PA4 | PA5 | PE4 | PE3 | PA0 | PA3 | PC0 | PC13
BODY_CENTER: FIGURE | FINISHED_SIZE | 0.254 | 0.4572 | 0.8 | 1.1 | 1.5 | 1.8 | 3.3 | 3.0x1.0 | DRILL CHART: TOP to BOTTOM | ALL UNITS ARE IN MILLIMETERS | ROTATION | - | 0.000 | 90.000 | PLATED | QTY | 155 | 24 | 2 | 60 | 8 | 4 | 1 | 258 | TOTAL HOLES:
